# Altium PCB PCB-Powermodule-v11.0.0.PcbDoc (part 2 of 5)
Units mil, origin at the board's own origin, x right, y up, seen from the top; angles counter-clockwise.
Board outline 3031.5 x 1495.87 mil, 4 copper layers (Top Layer, Ground, Power, Bottom Layer), stack 61.653 mil thick; 227 components, 160 nets, 893 pads, 326 vias.
Unrouted connection lines stored in the file: 45.
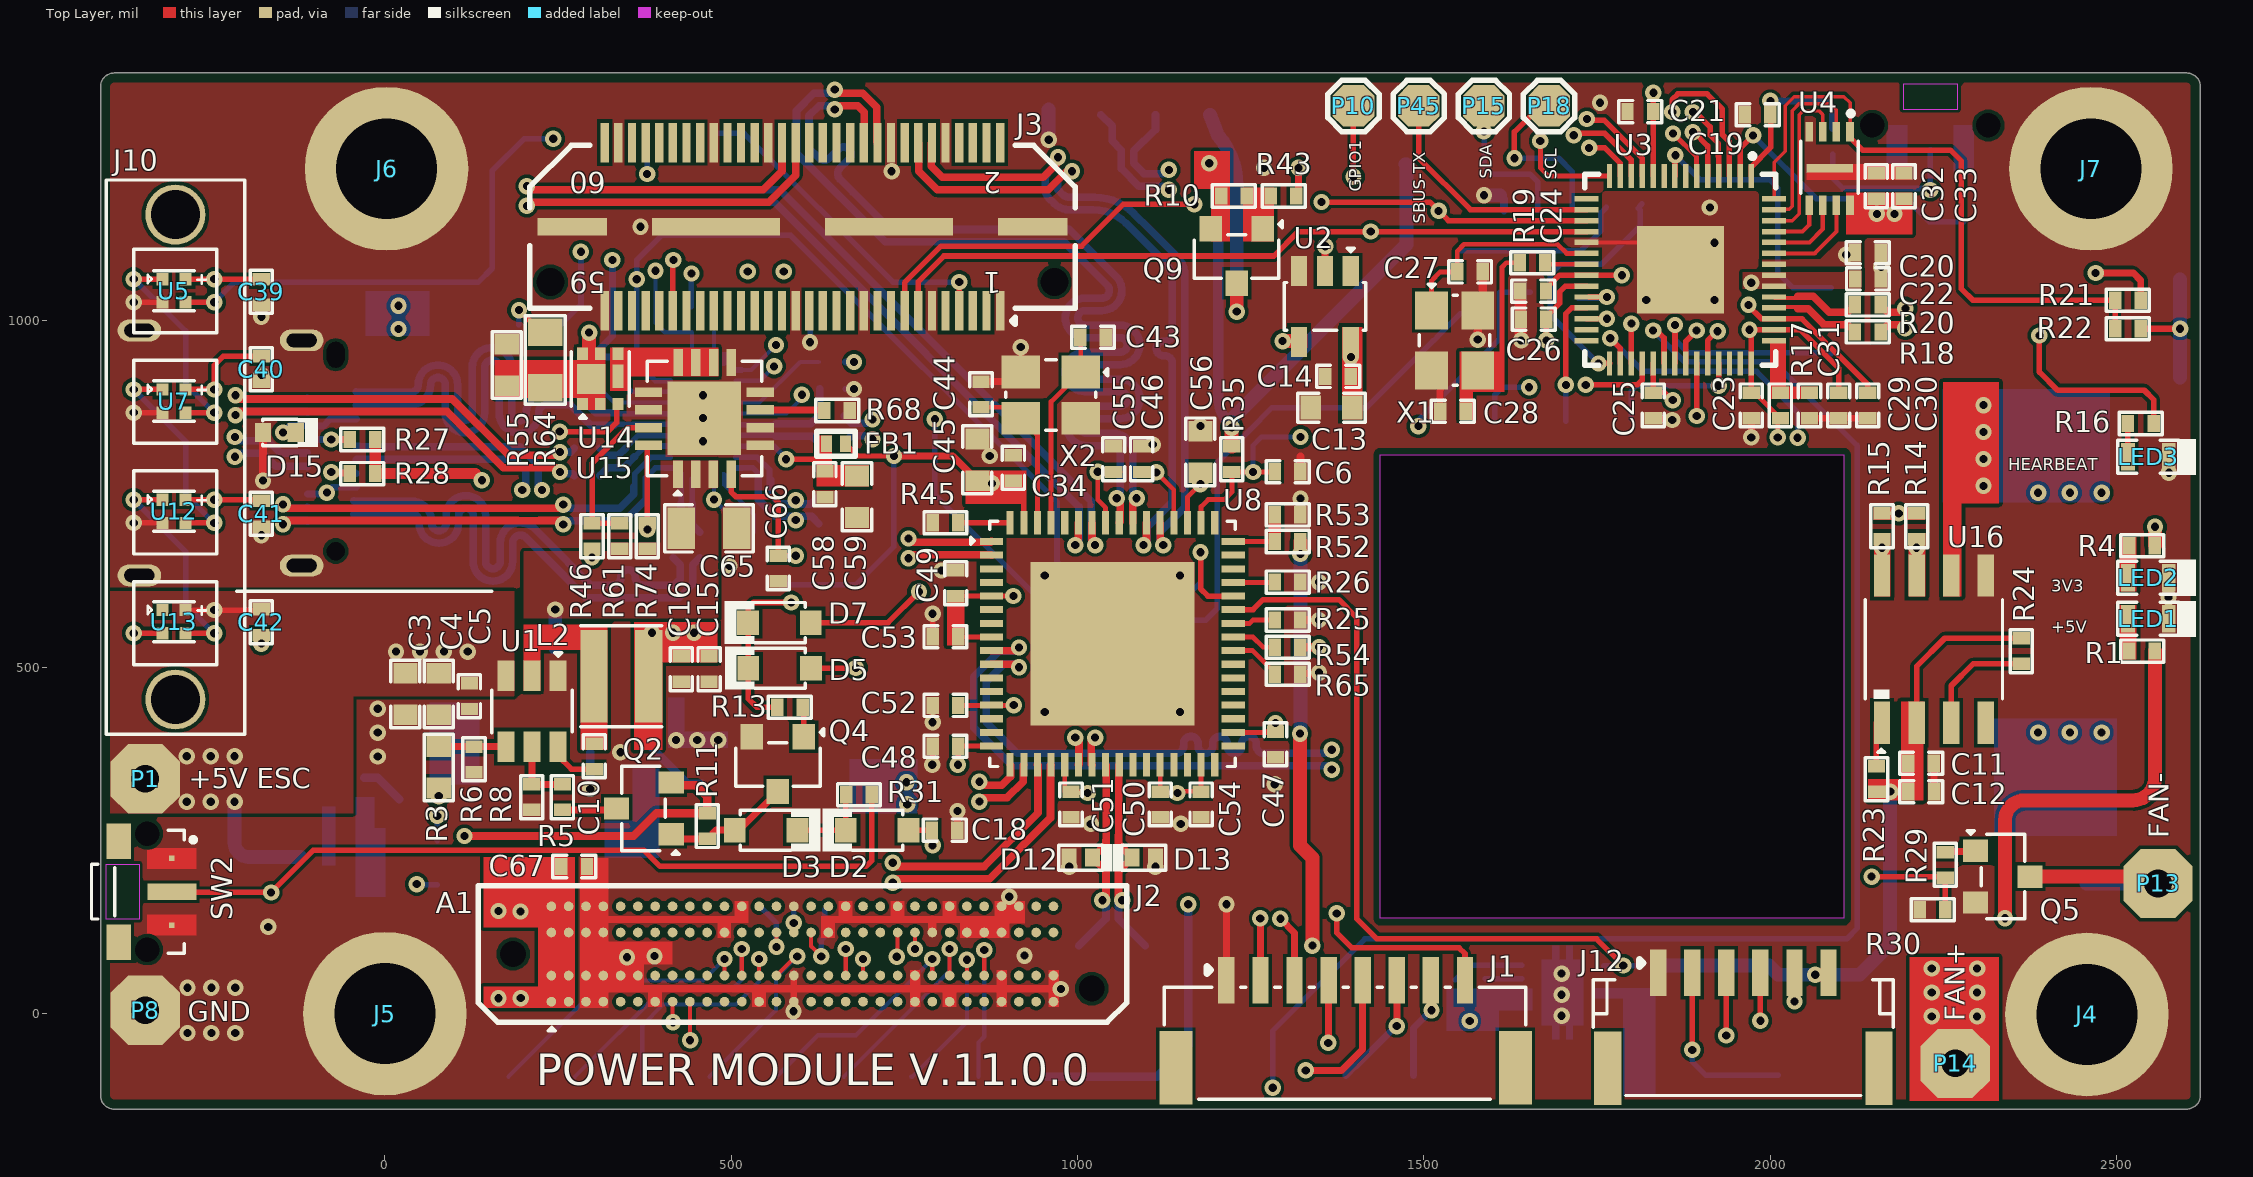
[diagram p0: Top Layer view]

## Part data (continued)
C66: library part CC0402KRX7R9BB473, "CAP CER 0.047UF 50V X7R 0402", Case Code (Imperial)=0402, Case Code (Metric)=1005, Dielectric=1511DielectricType, LCSC Part Number=C272875, Manufacturer=Yageo, Max Operating Temperature=125°C, Min Operating Temperature=-55°C, Supplier Part Number=2095687, Temperature Coefficient=30ppm/°C, Tolerance=10%, Voltage Rating=50V, Case/Package=0402, Category="Ceramic Capacitors", ComponentLink1Description=https://datasheet.octopart.com/CC0402KRX7R9BB473-Yageo-datasheet-166511530.pdf?src-supplier=Future+Electronics, ComponentLink1URL=https://datasheet.octopart.com/CC0402KRX7R9BB473-Yageo-datasheet-166511530.pdf?src-supplier=Future+Electronics, ComponentLink2Description=http://www.yageo.com/documents/recent/UPY-GPHC_X7R_6.3V-to-50V_18.pdf?src-supplier=Digikey, ComponentLink2URL=http://www.yageo.com/documents/recent/UPY-GPHC_X7R_6.3V-to-50V_18.pdf?src-supplier=Digikey, ComponentLink3Description=https://datasheet.octopart.com/CC0402KRX7R9BB473-Yageo-datasheet-140260305.pdf?src-supplier=Newark, ComponentLink3URL=https://datasheet.octopart.com/CC0402KRX7R9BB473-Yageo-datasheet-140260305.pdf?src-supplier=Newark, Halogen Free=5694HalogenFree, Height=550um, Item Type=Capacitor, Lead Free=5697LeadFree, Length=0.039inch, Manufacturer Part Number=CC0402KRX7R9BB473, Material=4241ConductorMaterial, Mounting Technology="Surface Mount", Packaging="Tape and Reel", Pricing="10000=0.0044, 40000=0.0042, 100000=0.004, 150000=0.0041, 250000=0.0039, 400000=0.0037, 500000=0.0038 (USD)", RoHS=Yes, RoHS Compliant=Yes, Series=CC, Stock=1130000, Supplier="Future Electronics", Thickness=0.022inch, Voltage Rating (DC)=50V, Width=0.02inch
D2 D3 D4 D5 D6 D7 D8 D10: "75V 200mW Single 1.25V@150mA 4ns 150mA SOD-323 Switching Diode ROHS", LCSC Part Number=C181133, Manufacturer="Guangdong Hottech", Package=SOD-323, Item Type=Diode, Manufacturer Part Number=1N4148WS
D12 D13: "4A@8/20us 15V 7V 5V Unidirectional DFN1006-2L TVS ROHS", LCSC Part Number=C239773, Manufacturer=WILLSEMI, Package=DFN1006-2L, ComponentLink1Description=LCSC, ComponentLink1URL=https://www.lcsc.com/product-detail/TVS_WILLSEMI-Will-Semicon-ESD5341N-2-TR_C239773.html, Item Type=Diode, Manufacturer Part Number=ESD5341N-2/TR
D15: "SOD-523 ESD and Surge Protection (TVS/ESD) ROHS", LCSC Part Number=C2890110, Manufacturer="TECH PUBLIC", Package=SOD-523, ComponentLink1Description=LCSC, ComponentLink1URL=https://www.lcsc.com/product-detail/span-style-background-color-ff0-ESD-span-and-Surge-Protection-TVS-span-style-background-color-ff0-ESD-span_TECH-PUBLIC-ESD5Z6-0T1G_C2890110.html, Item Type=(TVS/ESD), Manufacturer Part Number=ESD5Z6.0T1G
FB1: "FERRITE BEAD 220 OHM 0402 1LN", LCSC Part Number=C369802, Manufacturer=Sunlord, Item Type="Ferrite Beads", Manufacturer Part Number=HPZ1005D221R50TF, Pricing="1=0.14, 10=0.114, 25=0.0884, 50=0.0732, 100=0.0631, 250=0.05048, 500=0.04544, 1000=0.03788, 5000=0.03535 (USD)", RoHS=No, Stock=29750, Supplier=Digikey
J1: "CONN HEADER SMD R/A 8POS 1.25MM", Current Rating=1A, Flammability Rating="UL94 V-0", Housing Color=50Colour, Insulation Color=Natural, LCSC Part Number=C265111, Manufacturer=JST, Voltage Rating=50V, ComponentLink1Description=https://datasheet.ciiva.com/25617/0900766b810cef18-25617249.pdf?src-supplier=Rs, ComponentLink1URL=https://datasheet.ciiva.com/25617/0900766b810cef18-25617249.pdf?src-supplier=Rs, ComponentLink2Description=https://datasheet.ciiva.com/16290/jst20sm08b-ghs-tb-lf-sn-16290511.pdf?src-supplier=Future+Electronics, ComponentLink2URL=https://datasheet.ciiva.com/16290/jst20sm08b-ghs-tb-lf-sn-16290511.pdf?src-supplier=Future+Electronics, Connector Type=Header, Contact Finish - Mating=TIN, Contact Material=Bronze, Contact Shape=Rectangular, Contact Type="Outer Shroud Contact", Fastening Type=Ramp, Housing Material=4261ConductorMaterial, Insulation Material=Nylon, Item Type=Connectors, Lead Free=5697LeadFree, Manufacturer Part Number=SM08B-GHS-TB(LF)(SN), Mounting Technology="Surface Mount", Number of Contacts=8, Number of Positions=8, Number of Rows=1, Orientation="Right Angle", Packaging="Cut Tape", Pitch=1.25mm, Pricing="2500=0.3128, 5000=0.3063 (USD)", RoHS=Yes, Series=GH, Stock=5000, Supplier="Arrow Electronics", Termination=Solder
J2: "CONN 0.635MM HDR 30POS SMD", Manufacturer=Samtec, Supplier Part Number=2502799, Category=Connectors, ComponentLink1Description=http://suddendocs.samtec.com/catalog_english/adm6.pdf?src-supplier=Digi-Key, ComponentLink1URL=http://suddendocs.samtec.com/catalog_english/adm6.pdf?src-supplier=Digi-Key, ComponentLink2Description=https://datasheet.octopart.com/ADM6-30-01.5-L-4-2-A-TR-Samtec-datasheet-156965346.pdf?src-supplier=Sager+Electronics, ComponentLink2URL=https://datasheet.octopart.com/ADM6-30-01.5-L-4-2-A-TR-Samtec-datasheet-156965346.pdf?src-supplier=Sager+Electronics, ComponentLink3Description=https://datasheet.octopart.com/ADM6-30-01.5-L-4-2-A-TR-Samtec-datasheet-154586211.pdf?src-supplier=Toby+Electronics, ComponentLink3URL=https://datasheet.octopart.com/ADM6-30-01.5-L-4-2-A-TR-Samtec-datasheet-154586211.pdf?src-supplier=Toby+Electronics, ComponentLink4Description=https://datasheet.octopart.com/ADM6-30-01.5-L-4-2-A-TR-Samtec-datasheet-142027009.pdf?src-supplier=Master+Electronics, ComponentLink4URL=https://datasheet.octopart.com/ADM6-30-01.5-L-4-2-A-TR-Samtec-datasheet-142027009.pdf?src-supplier=Master+Electronics, Item Type=Connector, Manufacturer Part Number=ADM6-30-01.5-L-4-2-A-TR, Pricing="1=20.84 (GBP)", RoHS=No, Stock=10, Supplier=Rs
J3: "CONN HDR 60POS SMD GOLD", Manufacturer=Samtec, Supplier Part Number=1802786, Category=Connectors, ComponentLink1Description=https://datasheet.ciiva.com/9698/qth-9698170.pdf?src-supplier=Avnet, ComponentLink1URL=https://datasheet.ciiva.com/9698/qth-9698170.pdf?src-supplier=Avnet, ComponentLink2Description=https://datasheet.ciiva.com/400/qth-xxx-xx-x-d-xxx-mkt-400842.pdf?src-supplier=Digikey, ComponentLink2URL=https://datasheet.ciiva.com/400/qth-xxx-xx-x-d-xxx-mkt-400842.pdf?src-supplier=Digikey, Manufacturer Part Number=QTH-030-01-L-D-A-K-TR, Pricing="1=9.4, 25=8.99, 100=7.57, 250=6.25, 500=6.09 (GBP)", RoHS=Yes, Stock=69, Supplier=Rs
J4 J5 J6 J7: "Spacer Material: Steel Mounting: SMT Series: WA-SMSI Thread D: M2.5", Manufacturer="Wurth Electronics", Max Operating Temperature=150°C, Min Operating Temperature=-55°C, Supplier Part Number=732-7095-1-ND, Category="Spacers, Standoffs", ComponentLink1Description=http://www.farnell.com/datasheets/1960373.pdf?src-supplier=Farnell, ComponentLink1URL=http://www.farnell.com/datasheets/1960373.pdf?src-supplier=Farnell, ComponentLink2Description=http://www.mouser.com/ds/2/445/9774050151R-611428.pdf?src-supplier=Mouser, ComponentLink2URL=http://www.mouser.com/ds/2/445/9774050151R-611428.pdf?src-supplier=Mouser, ComponentLink3Description=https://media.digikey.com/pdf/Data%20Sheets/Wurth%20Electronics%20PDFs/WA-SMSx_Performance_Flyer.pdf?src-supplier=Digikey, ComponentLink3URL=https://media.digikey.com/pdf/Data%20Sheets/Wurth%20Electronics%20PDFs/WA-SMSx_Performance_Flyer.pdf?src-supplier=Digikey, ComponentLink4Description=http://www.farnell.com/datasheets/1960373.pdf?src-supplier=Element14, ComponentLink4URL=http://www.farnell.com/datasheets/1960373.pdf?src-supplier=Element14, ComponentLink5Description=https://datasheet.octopart.com/9774050151R-W%C3%BCrth-Elektronik-datasheet-48588545.pdf?src-supplier=Element14, ComponentLink5URL=https://datasheet.octopart.com/9774050151R-W%C3%BCrth-Elektronik-datasheet-48588545.pdf?src-supplier=Element14, ComponentLink6Description=http://www.farnell.com/datasheets/1960373.pdf?src-supplier=Newark, ComponentLink6URL=http://www.farnell.com/datasheets/1960373.pdf?src-supplier=Newark, ComponentLink7Description=https://katalog.we-online.de/em/datasheet/9774050151R.pdf?src-supplier=Digikey, ComponentLink7URL=https://katalog.we-online.de/em/datasheet/9774050151R.pdf?src-supplier=Digikey, Height=5.1mm, Item Type=Spacer, Length=0.252inch, Manufacturer Part Number=9774050151R, Material=Steel, Outside Diameter=0.201inch, Packaging=10Packaging, Plating=Tin, Pricing="1=1.16, 10=1.098, 50=0.979, 100=0.895 (USD)", Reach SVHC Compliant=Unknown, RoHS=Yes, Series=WA-SMSI, Stock=39400, Supplier=Digikey, Threaded/Unthreaded=Threaded
J8: "CONN RCP USB3.1 TYPEC 24P SMD RA", LCSC Part Number=C464604, Manufacturer=Amphenol, ComponentLink1Description=https://media.digikey.com/pdf/Data%20Sheets/Amphenol%20PDFs/12401832E402A_Dwg_RevX1_04-25-17.pdf?src-supplier=Digikey, ComponentLink1URL=https://media.digikey.com/pdf/Data%20Sheets/Amphenol%20PDFs/12401832E402A_Dwg_RevX1_04-25-17.pdf?src-supplier=Digikey, Item Type="USB Connectors", Manufacturer Part Number=12401832E402A, Pricing="1=1.33, 25=1.17, 100=1.04, 250=1.01, 500=0.976 (USD)", RoHS=No, Stock=6472, Supplier=Avnet
J9: "Battery clip Nickel Phosphor Bronze CR927 SMD Button And Strip Battery Connector ROHS", LCSC Part Number=C2902336, Manufacturer=MYOUNG, Package=SMD, ComponentLink1Description=LCSC, ComponentLink1URL=https://www.lcsc.com/product-detail/Button-And-Strip-Battery-Connector_MYOUNG-MY-927-02_C2902336.html, Item Type="Battery Connector", Manufacturer Part Number=MY-927-02
J10: "LED INDICATION, ROUND, CLEAR, DO", Manufacturer=Bivar, Supplier Part Number=492-LPAV3-160-1000D-1-4-ND, ComponentLink1Description=https://cdn2.hubspot.net/hubfs/5642389/LPAV3-160-1000D-1-4_A.pdf?src-supplier=Digikey, ComponentLink1URL=https://cdn2.hubspot.net/hubfs/5642389/LPAV3-160-1000D-1-4_A.pdf?src-supplier=Digikey, Item Type="Light Pipe", Lens Size=3mm, Lens Style=Round,Domed, Manufacturer Part Number=LPAV3-160-1000D-1-4, Mounting Technology=Press-Fit,Board, Pricing="1=3.89, 10=2.865, 100=2.2565, 500=1.98982, 1000=1.90308, 2000=1.82968, 5000=1.74974 (USD)", RoHS=No, Series=-, Supplier=Digikey
J11 J12: "CONN HEADER SMD R/A 6POS 1.25MM", Current Rating=1A, Flammability Rating="UL94 V-0", Insulation Color=Natural, LCSC Part Number=C133065, Manufacturer=JST, Max Operating Temperature=85°C, Min Operating Temperature=-25°C, Voltage Rating=50V, ComponentLink1Description=https://datasheet.ciiva.com/25617/0900766b810cef18-25617251.pdf?src-supplier=Rs, ComponentLink1URL=https://datasheet.ciiva.com/25617/0900766b810cef18-25617251.pdf?src-supplier=Rs, ComponentLink2Description=https://datasheet.ciiva.com/16487/jstsm06b-ghs-tb-lf-sn-16487196.pdf?src-supplier=Future+Electronics, ComponentLink2URL=https://datasheet.ciiva.com/16487/jstsm06b-ghs-tb-lf-sn-16487196.pdf?src-supplier=Future+Electronics, Connector Type=Header, Contact Finish - Mating=TIN, Contact Material=Bronze, Contact Shape=Rectangular, Contact Type="Outer Shroud Contact", Fastening Type=Ramp, Insulation Material=Nylon, Item Type=Headers, Lead Free="Lead Free", Manufacturer Part Number=SM06B-GHS-TB(LF)(SN), Mounting Technology="Surface Mount", Number of Contacts=6, Number of Positions=6, Number of Rows=1, Orientation="Right Angle", Packaging="Cut Tape", Pitch=1.25mm, Pricing="2500=0.25, 5000=0.245, 7500=0.24, 10000=0.235 (USD)", RoHS=Yes, Series=GH, Supplier="Future Electronics", Termination=Solder
L1: library part YSPI0520-2R2M, "4A 2.2uH ±20% 32mΩ SMD,5.4x5.2x2mm Power Inductors ROHS", LCSC Part Number=C718375, Manufacturer=YJYCOIN, ComponentLink1Description=LCSC, ComponentLink1URL=https://www.lcsc.com/product-detail/Power-Inductors_YJYCOIN-YSPI0520-2R2M_C718375.html, Item Type=Inductor, Manufacturer Part Number=YSPI0520-2R2M
L2: library part VLS3012HBX-3R3M, "FIXED IND 3.3UH 2.63A 150MOHM SM", Case/Package=Nonstandard, Current Rating=2.63A, DC Resistance (DCR)=150mR, Manufacturer=TDK, Max Operating Temperature=105°C, Min Operating Temperature=-40°C, Saturation Current=2.82A, Supplier Part Number=445-175070-1-ND, Test Frequency=1MHz, Tolerance=20%, Category="Fixed Inductors", ComponentLink1Description=http://www.farnell.com/datasheets/2724074.pdf?src-supplier=Farnell, ComponentLink1URL=http://www.farnell.com/datasheets/2724074.pdf?src-supplier=Farnell, ComponentLink2Description=https://product.tdk.com/info/en/catalog/datasheets/inductor_commercial_power_vls3012hbx_en.pdf?src-supplier=Digi-Key, ComponentLink2URL=https://product.tdk.com/info/en/catalog/datasheets/inductor_commercial_power_vls3012hbx_en.pdf?src-supplier=Digi-Key, ComponentLink3Description=https://product.tdk.com/info/en/catalog/datasheets/inductor_commercial_power_vls3012hbx_en.pdf?ref_disty=digikey&src-supplier=Digi-Key, ComponentLink3URL=https://product.tdk.com/info/en/catalog/datasheets/inductor_commercial_power_vls3012hbx_en.pdf?ref_disty=digikey&src-supplier=Digi-Key, ComponentLink4Description=http://www.farnell.com/datasheets/2724074.pdf?src-supplier=Newark, ComponentLink4URL=http://www.farnell.com/datasheets/2724074.pdf?src-supplier=Newark, Core Material=Metal, Manufacturer Part Number=VLS3012HBX-3R3M, Mounting Technology="Surface Mount", Packaging="Cut Tape", Pricing="1=0.6, 10=0.512, 25=0.4692, 50=0.4264, 100=0.3795, 250=0.3582, 500=0.30702, 1000=0.27291 (USD)", RoHS=Yes, RoHS Compliant=Yes, Series=VLS-HBX, Shielding=Shielded, Stock=9595, Supplier=Digi-Key
LED1 LED2 LED3: library part NCD0603G2, "Emerald 0603 Light Emitting Diodes (LED) ROHS", LCSC Part Number=C87326, Manufacturer="Foshan NationStar Optoelectronics", Package=0603, ComponentLink1Description=LCSC, ComponentLink1URL=https://www.lcsc.com/product-detail/Light-Emitting-Diodes-LED_Foshan-NationStar-Optoelectronics-NCD0603G2_C87326.html, Item Type=LED, Manufacturer Part Number=NCD0603G2
LED5: library part NCD0603R3, "RED LED 0603 Light Emitting Diodes", LCSC Part Number=C3151730, Manufacturer="Foshan NationStar Optoelectronics", Package=0603, ComponentLink1Description=LCSC, ComponentLink1URL=https://www.lcsc.com/product-detail/Light-Emitting-Diodes-LED_Foshan-NationStar-Optoelectronics-NCD0603R3_C3151730.html, Item Type=LED, Manufacturer Part Number=NCD0603R3
P2 P3 P7 P9 P10 P11 P12 P15 P16 P17 P18 P19 P20 P21 P22 P24 P25 P26 P27 P28 P29 P30 P31 P33 P34 P35 P36 P37 P38 P39 P43 P44 P45: "Test Point ON", Item Type="TEST POINT", Manufacturer Part Number="TEST POINT"
Q2 Q9: "null 3A 400mW 112mΩ@4.5V,2.8A 1V@250uA P Channel SOT-23 MOSFETs ROHS", LCSC Part Number=C5290223, Manufacturer=FUXINSEMI, Package=MOSFET, ComponentLink1Description=LCSC, ComponentLink1URL=https://www.lcsc.com/product-detail/MOSFETs_FUXINSEMI-SI2301CDS_C5290223.html, Item Type=SOT-23, Manufacturer Part Number=SI2301CDS
Q3 Q4: "45V 300mW 100@100mA,1V 500mA NPN SOT-23 Bipolar Transistors - BJT ROHS", LCSC Part Number=C371086, Manufacturer=DOWO, Package=SOT-23, ComponentLink1Description=LCSC, ComponentLink1URL=https://www.lcsc.com/product-detail/Bipolar-Transistors-BJT_DOWO-BC817-6B-160-400_C371086.html, Item Type=Transistor, Manufacturer Part Number="BC817 6B 160-400"
Q5: "MOSFET N-CH 60V 320MA SOT23-3", Case/Package=SOT-23-3, Continuous Drain Current (ID)=320mA, Drain to Source Breakdown Voltage=60V, Drain to Source Resistance=1.6R, Gate to Source Voltage (Vgs)=20V, Input Capacitance=24.5pF, LCSC Part Number=C116584, Manufacturer="ON Semiconductor", Max Operating Temperature=150°C, Max Power Dissipation=420mW, Min Operating Temperature=-55°C, Package Quantity=1, Power Dissipation=300mW, Supplier Part Number=3445699, Threshold Voltage=2.3V, Category=MOSFETs, ComponentLink1Description=https://datasheet.ciiva.com/1254/2n7002k-d-1254499.pdf?src-supplier=Newark, ComponentLink1URL=https://datasheet.ciiva.com/1254/2n7002k-d-1254499.pdf?src-supplier=Newark, ComponentLink2Description=https://datasheet.ciiva.com/16220/2n7002k-d-16220919.pdf?src-supplier=Future+Electronics, ComponentLink2URL=https://datasheet.ciiva.com/16220/2n7002k-d-16220919.pdf?src-supplier=Future+Electronics, ComponentLink3Description=https://datasheet.ciiva.com/936/2n7002k-d-936793.pdf?src-supplier=Digikey, ComponentLink3URL=https://datasheet.ciiva.com/936/2n7002k-d-936793.pdf?src-supplier=Digikey, Contact Plating=Tin,Matte, Drain-source On Resistance-Max=1.6R, Element Configuration=Single, Fall Time=9ns, Halogen Free="Halogen Free", Height=1.01mm, Item Type=MOSFET, Lead Free="Lead Free", Length=3.04mm, Manufacturer Part Number=2N7002KT1G, Nominal Vgs=2.3V, Number of Channels=1NUMBER, Number of Elements=1, Packaging="Tape and Reel", Pins=3, Polarity=N-CHANNEL, Pricing="3000=0.0238, 12000=0.0228, 45000=0.0218, 75000=0.0215, 150000=0.0204 (USD)", Radiation Hardening=No, Rds On Max=1.6R, Reach SVHC Compliant=No, Rise Time=9ns, RoHS=Yes, RoHS Compliant=Yes, Series=-, Stock=51000, Supplier="Future Electronics", Turn-Off Delay Time=55.8ns, Turn-On Delay Time=12.2ns, Width=1.4mm
Q7: "MOSFET P-CH 20V 6.9A 6TSOP", Drain to Source Breakdown Voltage=-20V, Drain to Source Resistance=26mR, LCSC Part Number=C538190, Manufacturer=Infineon, On-State Resistance=-32mR, Package Quantity=3000NUMBER, Power Dissipation=2W, ComponentLink1Description=http://www.farnell.com/datasheets/1911990.pdf?src-supplier=Farnell, ComponentLink1URL=http://www.farnell.com/datasheets/1911990.pdf?src-supplier=Farnell, ComponentLink2Description=http://www.farnell.com/datasheets/1911990.pdf?src-supplier=Element14, ComponentLink2URL=http://www.farnell.com/datasheets/1911990.pdf?src-supplier=Element14, ComponentLink3Description=https://datasheet.octopart.com/IRLTS2242TRPBF-Infineon-datasheet-41193307.pdf?src-supplier=Newark, ComponentLink3URL=https://datasheet.octopart.com/IRLTS2242TRPBF-Infineon-datasheet-41193307.pdf?src-supplier=Newark, ComponentLink4Description=https://www.infineon.com/dgdl/irlts2242pbf.pdf?fileId=5546d462533600a401535671e9a12718&src-supplier=Digikey, ComponentLink4URL=https://www.infineon.com/dgdl/irlts2242pbf.pdf?fileId=5546d462533600a401535671e9a12718&src-supplier=Digikey, ComponentLink5Description=https://datasheet.octopart.com/IRLTS2242TRPBF-Infineon-datasheet-11534477.pdf?src-supplier=Farnell, ComponentLink5URL=https://datasheet.octopart.com/IRLTS2242TRPBF-Infineon-datasheet-11534477.pdf?src-supplier=Farnell, Element Configuration=5460ElementConfiguration, Fall Time=68ns, Height=1.3mm, Item Type=MOSFETs, Length=3mm, Manufacturer Part Number=IRLTS2242TRPBF, Number of Channels=1NUMBER, Number of Elements=1NUMBER, Pricing="1=0.44, 10=0.372, 50=0.372, 100=0.259, 1000=0.164, 10000=0.129 (USD)", Radiation Hardening=5898YesNo, RoHS=Yes, Stock=67736, Supplier=Mouser, Turn-Off Delay Time=18ns, Turn-On Delay Time=5.8ns, Width=1.75mm
R1: library part RC0402FR-07560RL, "RES 560 OHM 1% 1/16W 0402", Case Code (Imperial)=0402, Case Code (Metric)=1005, LCSC Part Number=C163460, Manufacturer=Yageo, Max Operating Temperature=155°C, Max Power Dissipation=63mW, Min Operating Temperature=-55°C, Package Quantity=1, Resistance Tolerance=1%, Resistor Type="Thick Film", Supplier Part Number=8872046, Temperature Coefficient=100ppm/°C, Voltage Rating=50V, Case/Package=0402, Category="Chip SMD Resistors", ComponentLink1Description=https://datasheet.ciiva.com/2453/pyu-r-int-thick-7-2453458.pdf?src-supplier=Digikey, ComponentLink1URL=https://datasheet.ciiva.com/2453/pyu-r-int-thick-7-2453458.pdf?src-supplier=Digikey, ComponentLink2Description=https://datasheet.ciiva.com/2453/pyu-r-int-thick-7-2453459.pdf?src-supplier=Digikey, ComponentLink2URL=https://datasheet.ciiva.com/2453/pyu-r-int-thick-7-2453459.pdf?src-supplier=Digikey, ComponentLink3Description=https://datasheet.ciiva.com/2453/pyu-r-int-thick-7-2453457.pdf?src-supplier=Digikey, ComponentLink3URL=https://datasheet.ciiva.com/2453/pyu-r-int-thick-7-2453457.pdf?src-supplier=Digikey, ComponentLink4Description=https://datasheet.ciiva.com/12558/pyu-rc0402-51-rohs-l-6-r-8721-12558383.pdf?src-supplier=Mouser, ComponentLink4URL=https://datasheet.ciiva.com/12558/pyu-rc0402-51-rohs-l-6-r-8721-12558383.pdf?src-supplier=Mouser, ComponentLink5Description=https://datasheet.ciiva.com/7850/1018594-7850042.pdf?src-supplier=Element14, ComponentLink5URL=https://datasheet.ciiva.com/7850/1018594-7850042.pdf?src-supplier=Element14, ComponentLink6Description=https://datasheet.ciiva.com/7850/1018594-7850043.pdf?src-supplier=Element14, ComponentLink6URL=https://datasheet.ciiva.com/7850/1018594-7850043.pdf?src-supplier=Element14, Construction=Rectangular, Depth=0.5mm, Features="Moisture Resistant", Height=0.016inch, Item Type=Resistor, Lead Free="Lead Free", Length=1mm, Manufacturer Part Number=RC0402FR-07560RL, Military Standard=Not, Number of Terminations=2, Packaging="Tape and Reel", Power Rating=63mW, Pricing="10000=0.0012, 100000=0.0011, 300000=0.0011, 1250000=0.001, 3000000=0.0009 (USD)", Reach SVHC Compliant=Unknown, RoHS=Yes, RoHS Compliant=Yes, Series=RC, Stock=1360000, Supplier="Future Electronics", Termination=SMD/SMT, Tolerance=1%, Width=0.02inch
R2 R8 R11 R12 R13 R29 R30 R34 R59 R71 R72 R73: library part RC0402FR-07100KL, "RES 100K OHM 1% 1/16W 0402", Case Code (Imperial)=0402, Case Code (Metric)=1005, LCSC Part Number=C60491, Manufacturer=Yageo, Max Operating Temperature=155°C, Max Power Dissipation=63mW, Min Operating Temperature=-55°C, Package Quantity=1, Resistance=100kR, Resistance Tolerance=1%, Resistor Type="Thick Film", Supplier Part Number 1=603-RC0402FR-07100KL, Temperature Coefficient=100ppm/°C, Voltage Rating=50V, Case/Package=0402, Category="Chip SMD Resistors", ComponentLink1Description=https://datasheet.ciiva.com/11819/0900766b80c66297-11819452.pdf?src-supplier=RSComponents, ComponentLink1URL=https://datasheet.ciiva.com/11819/0900766b80c66297-11819452.pdf?src-supplier=RSComponents, ComponentLink2Description=https://datasheet.ciiva.com/22747/1018594-22747509.pdf?src-supplier=Element14, ComponentLink2URL=https://datasheet.ciiva.com/22747/1018594-22747509.pdf?src-supplier=Element14, ComponentLink3Description=https://datasheet.ciiva.com/2453/pyu-r-int-thick-7-2453362.pdf?src-supplier=Digi-Key, ComponentLink3URL=https://datasheet.ciiva.com/2453/pyu-r-int-thick-7-2453362.pdf?src-supplier=Digi-Key, ComponentLink4Description=https://datasheet.ciiva.com/2453/pyu-r-int-thick-7-2453363.pdf?src-supplier=Digi-Key, ComponentLink4URL=https://datasheet.ciiva.com/2453/pyu-r-int-thick-7-2453363.pdf?src-supplier=Digi-Key, ComponentLink5Description=https://datasheet.ciiva.com/2453/pyu-r-int-thick-7-2453361.pdf?src-supplier=Digi-Key, ComponentLink5URL=https://datasheet.ciiva.com/2453/pyu-r-int-thick-7-2453361.pdf?src-supplier=Digi-Key, ComponentLink6Description=https://datasheet.ciiva.com/12667/pyu-rc0402-51-rohs-l-6-r-12667930.pdf?src-supplier=Mouser, ComponentLink6URL=https://datasheet.ciiva.com/12667/pyu-rc0402-51-rohs-l-6-r-12667930.pdf?src-supplier=Mouser, ComponentLink7Description=https://datasheet.ciiva.com/15189/getdatasheetpartid-323696-15189334.pdf?src-supplier=Verical, ComponentLink7URL=https://datasheet.ciiva.com/15189/getdatasheetpartid-323696-15189334.pdf?src-supplier=Verical, Construction=Rectangular, Depth=0.5mm, Features="Moisture Resistant", Height=0.016inch, Item Type=Resistor, Lead Free="Lead Free", Length=0.039inch, Manufacturer Part Number=RC0402FR-07100KL, Military Standard=Not, Number of Terminations=2, Packaging="Tape and Reel", Power Rating=63mW, Pricing 1="1=0.10000, 10=0.01200, 50=0.01200, 100=0.00500, 1000=0.00300, 2500=0.00200, 10000=0.00100 (USD)", REACH SVHC="No SVHC", RoHS=Yes, RoHS Compliant=Yes, Series=RC, Stock 1=7759549, Supplier 1=Mouser, Technology="THICK FILM", Termination=SMD/SMT, Tolerance=1%, Width=0.02inch, Working Voltage=50V
R3: library part RC0603FR-0733K2L, "RES 33.2K OHM 1% 1/10W 0603", Case Code (Imperial)=0603, Case Code (Metric)=1608, LCSC Part Number=C185338, Manufacturer=Yageo, Max Operating Temperature=155°C, Max Power Dissipation=100mW, Min Operating Temperature=-55°C, Resistance=33.2kR, Resistor Type="Thick Film", Supplier Part Number 1=311-33.2KHRCT-ND, Temperature Coefficient=100ppm/°C, Tolerance=1%, Voltage Rating=50V, Case/Package=0603, Category="Chip SMD Resistors", ComponentLink1Description=https://datasheet.ciiva.com/11808/0900766b80f96399-11808316.pdf?src-supplier=RSComponents, ComponentLink1URL=https://datasheet.ciiva.com/11808/0900766b80f96399-11808316.pdf?src-supplier=RSComponents, Construction=Rectangular, Depth=0.8mm, Features="Moisture Resistant", Height=0.45mm, Lead Free="Lead Free", Length=1.6mm, Manufacturer Part Number=RC0603FR-0733K2L, Military Standard=Not, Mount="Surface Mount", Number of Terminations=2, Packaging="Tape and Reel", Power Rating=100mW, Pricing 1="1=0.10000, 10=0.02300, 100=0.00930, 1000=0.00417, 2500=0.00362 (USD)", RoHS=Yes, RoHS Compliant=Yes, Series=RC, Size Code=0603, Stock 1=1293262, Supplier 1=Digi-Key, Technology="THICK FILM", Termination=SMD/SMT, Voltage Rating (DC)=50V
R4 R16 R17: library part RC0402FR-07200RL, "RES 200 OHM 1% 1/16W 0402", Case Code (Imperial)=0402, Case Code (Metric)=1005, LCSC Part Number=C114764, Manufacturer=Yageo, Max Operating Temperature=155°C, Max Power Dissipation=63mW, Min Operating Temperature=-55°C, Package Quantity=1, Resistance Tolerance=1%, Resistor Type="Thick Film", Supplier Part Number 1=311-200LRCT-ND, Temperature Coefficient=100ppm/°C, Voltage Rating=50V, Case/Package=0402, Category="Chip SMD Resistors", ComponentLink1Description=https://datasheet.ciiva.com/2553/pyu-r-int-thick-7-2553232.pdf?src-supplier=Digi-Key, ComponentLink1URL=https://datasheet.ciiva.com/2553/pyu-r-int-thick-7-2553232.pdf?src-supplier=Digi-Key, ComponentLink2Description=https://datasheet.ciiva.com/7983/1018594-7983509.pdf?src-supplier=Element14, ComponentLink2URL=https://datasheet.ciiva.com/7983/1018594-7983509.pdf?src-supplier=Element14, ComponentLink3Description=https://datasheet.ciiva.com/16804/pyu-rc0402-51-rohs-l-6-r-16804406.pdf?src-supplier=Future+Electronics, ComponentLink3URL=https://datasheet.ciiva.com/16804/pyu-rc0402-51-rohs-l-6-r-16804406.pdf?src-supplier=Future+Electronics, ComponentLink4Description=https://datasheet.ciiva.com/15189/getdatasheetpartid-331152-15189383.pdf?src-supplier=Verical, ComponentLink4URL=https://datasheet.ciiva.com/15189/getdatasheetpartid-331152-15189383.pdf?src-supplier=Verical, ComponentLink5Description=https://datasheet.ciiva.com/7849/1018594-7849898.pdf?src-supplier=Element14, ComponentLink5URL=https://datasheet.ciiva.com/7849/1018594-7849898.pdf?src-supplier=Element14, ComponentLink6Description=https://datasheet.ciiva.com/5562/pyu-rc0402-51-rohs-l-6-r-8721-5562539.pdf?src-supplier=Mouser, ComponentLink6URL=https://datasheet.ciiva.com/5562/pyu-rc0402-51-rohs-l-6-r-8721-5562539.pdf?src-supplier=Mouser, ComponentLink7Description=https://datasheet.ciiva.com/7849/1018594-7849899.pdf?src-supplier=Element14, ComponentLink7URL=https://datasheet.ciiva.com/7849/1018594-7849899.pdf?src-supplier=Element14, ComponentLink8Description=https://datasheet.ciiva.com/2553/pyu-r-int-thick-7-2553230.pdf?src-supplier=Digi-Key, ComponentLink8URL=https://datasheet.ciiva.com/2553/pyu-r-int-thick-7-2553230.pdf?src-supplier=Digi-Key, ComponentLink9Description=https://datasheet.ciiva.com/2553/pyu-r-int-thick-7-2553231.pdf?src-supplier=Digi-Key, ComponentLink9URL=https://datasheet.ciiva.com/2553/pyu-r-int-thick-7-2553231.pdf?src-supplier=Digi-Key, Construction=Rectangular, Depth=0.5mm, Features="Moisture Resistant", Height=0.016inch, Lead Free="Lead Free", Length=1mm, Manufacturer Part Number=RC0402FR-07200RL, Military Standard=Not, Number of Terminations=2, Packaging="Tape and Reel", Power Rating=63mW, Pricing 1="1=0.10000, 10=0.01600, 100=0.00660, 1000=0.00299, 2500=0.00259, 5000=0.00214 (USD)", REACH SVHC="No SVHC", Resistance=200R, RoHS=Yes, RoHS Compliant=Yes, Series=RC, Size Code=0402, Stock 1=19778, Supplier 1=Digi-Key, Termination=SMD/SMT, Tolerance=1%, Voltage Rating (DC)=50V, Width=0.02inch
R5 R6 R10 R21 R25 R26 R35 R37 R53 R54 R60 R61 R65 R66 R69 R70: library part RC0402FR-0710KL, "RES 10K OHM 1% 1/16W 0402", Case Code (Imperial)=0402, Case Code (Metric)=1005, LCSC Part Number=C60490, Manufacturer=Yageo, Max Operating Temperature=155°C, Max Power Dissipation=63mW, Min Operating Temperature=-55°C, Power Rating=62.5mW, Resistance=10kR, Resistance Tolerance=1%, Resistor Type="Thick Film", Supplier Part Number 1=603-RC0402FR-0710KL, Temperature Coefficient=100ppm/°C, Voltage Rating=50V, Case/Package=0402, Category="Chip SMD Resistors", ComponentLink1Description=https://datasheet.ciiva.com/7660/38568-7660787.pdf?src-supplier=Element14, ComponentLink1URL=https://datasheet.ciiva.com/7660/38568-7660787.pdf?src-supplier=Element14, ComponentLink2Description=https://datasheet.ciiva.com/7849/1686128-7849814.pdf?src-supplier=Element14, ComponentLink2URL=https://datasheet.ciiva.com/7849/1686128-7849814.pdf?src-supplier=Element14, ComponentLink3Description=https://datasheet.ciiva.com/7983/1018594-7983486.pdf?src-supplier=Element14, ComponentLink3URL=https://datasheet.ciiva.com/7983/1018594-7983486.pdf?src-supplier=Element14, ComponentLink4Description=https://datasheet.ciiva.com/22747/1018594-22747512.pdf?src-supplier=Element14, ComponentLink4URL=https://datasheet.ciiva.com/22747/1018594-22747512.pdf?src-supplier=Element14, ComponentLink5Description=https://datasheet.ciiva.com/12667/pyu-rc0402-51-rohs-l-6-r-12667067.pdf?src-supplier=Mouser, ComponentLink5URL=https://datasheet.ciiva.com/12667/pyu-rc0402-51-rohs-l-6-r-12667067.pdf?src-supplier=Mouser, ComponentLink6Description=https://datasheet.ciiva.com/7849/1784430-7849813.pdf?src-supplier=Element14, ComponentLink6URL=https://datasheet.ciiva.com/7849/1784430-7849813.pdf?src-supplier=Element14, ComponentLink7Description=https://datasheet.ciiva.com/7849/1784430-7849815.pdf?src-supplier=Element14, ComponentLink7URL=https://datasheet.ciiva.com/7849/1784430-7849815.pdf?src-supplier=Element14, Construction=Rectangular, Depth=0.5mm, Features="Moisture Resistant", Height=0.32mm, Item Type=Resistor, Lead Free="Lead Free", Lead Pitch=0.2mm, Length=1mm, Manufacturer Part Number=RC0402FR-0710KL, Military Standard=Not, Number of Pins=2, Number of Terminations=2, Packaging="Tape and Reel", Pricing 1="1=0.10000, 10=0.01400, 50=0.01400, 100=0.00500, 1000=0.00300, 10000=0.00200 (USD)", REACH SVHC="No SVHC", RoHS=Yes, RoHS Compliant=Yes, Series=RC, Stock 1=18648329, Supplier 1=Mouser, Termination=SMD/SMT, Tolerance=1%, Voltage Rating (DC)=50V, Width=0.5mm, Working Voltage=50V
R7: library part RT0402BRD07390RL, "RES SMD 390 OHM 0.1% 1/16W 0402", Case Code (Imperial)=0402, Case Code (Metric)=1005, LCSC Part Number=C852752, Manufacturer=Yageo, Max Operating Temperature=155°C, Max Power Dissipation=63mW, Min Operating Temperature=-55°C, Power Rating=62.5mW, Temperature Coefficient=25ppm/°C, Tolerance=0.1%, Voltage Rating=50V, Case/Package=0402, ComponentLink1Description=https://datasheet.ciiva.com/12798/pyu-rt-1-to-0-05-rohs-l-4-12798633.pdf?src-supplier=Mouser, ComponentLink1URL=https://datasheet.ciiva.com/12798/pyu-rt-1-to-0-05-rohs-l-4-12798633.pdf?src-supplier=Mouser, Height=0.3mm, Item Type=Resistors, Lead Free="Lead Free", Length=1mm, Manufacturer Part Number=RT0402BRD07390RL, Number of Terminations=2, Packaging="Tape and Reel", Pricing="1=0.12, 10=0.064, 50=0.064, 100=0.049, 1000=0.037, 10000=0.031 (USD)", RoHS=Yes, RoHS Compliant=Yes, Series=RT, Stock=20717, Supplier=Mouser, Termination=SMD/SMT, Voltage Rating (DC)=50V, Weight=2.3E-05oz, Width=0.5mm